# Altium PCB LiBattPack8.PcbDoc
Units mil, origin at the board's own origin, x right, y up, seen from the top; angles counter-clockwise.
Board outline 2950 x 6760 mil, 2 copper layers (Top Layer, Bottom Layer); 15 components, 6 nets, 54 pads, 0 vias.
Unrouted connection lines stored in the file: 36.
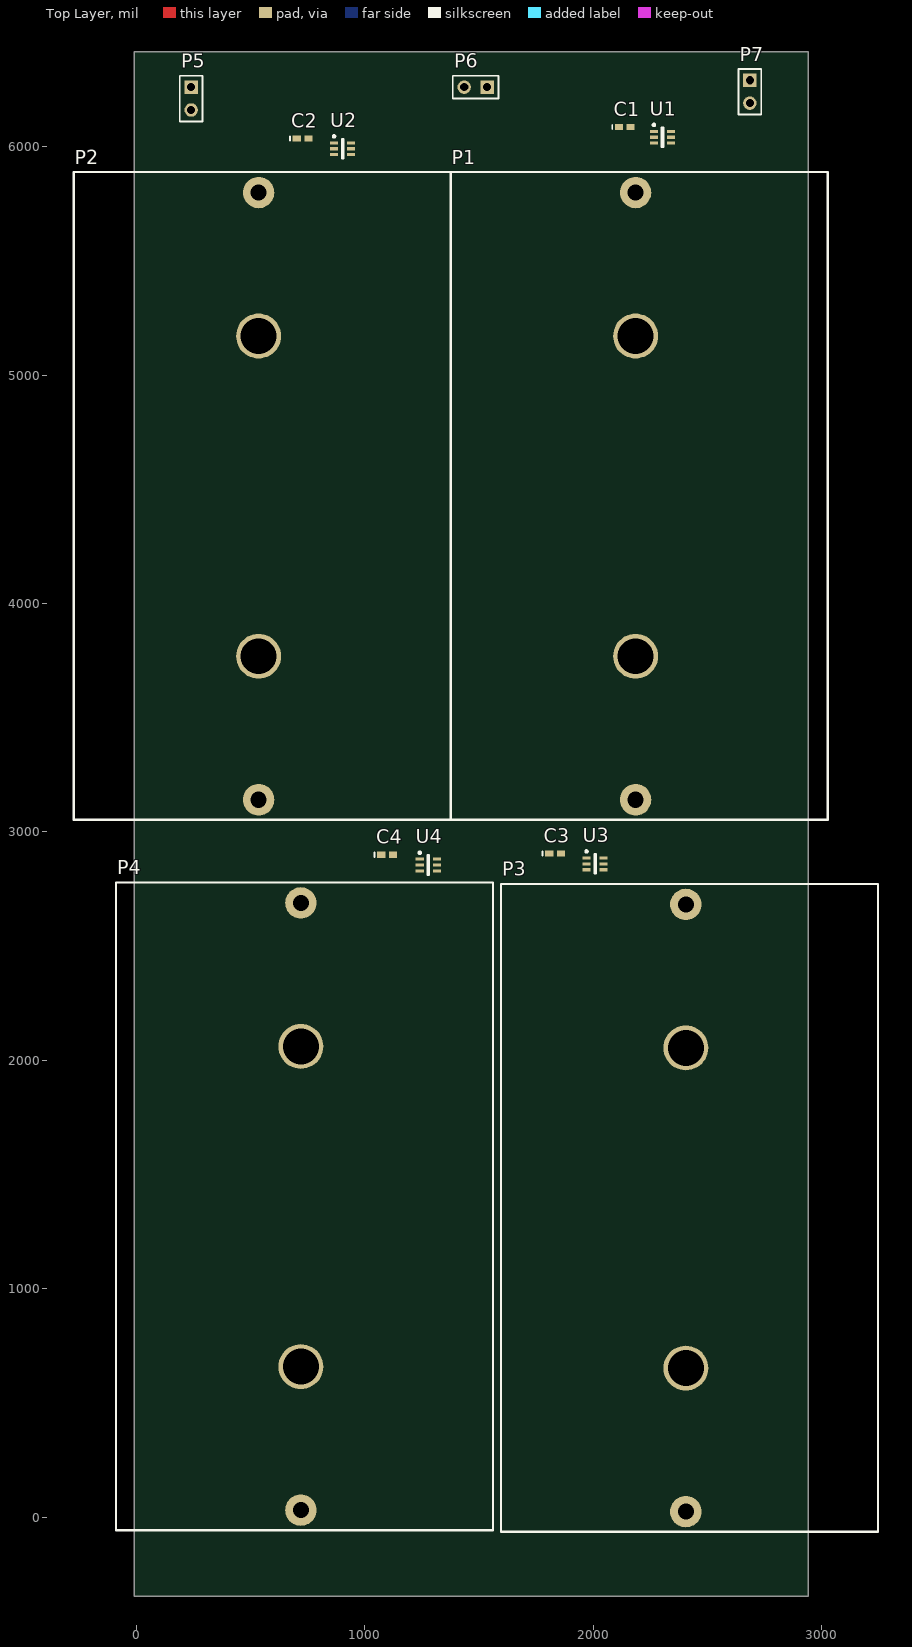
[diagram p0: Top Layer view]
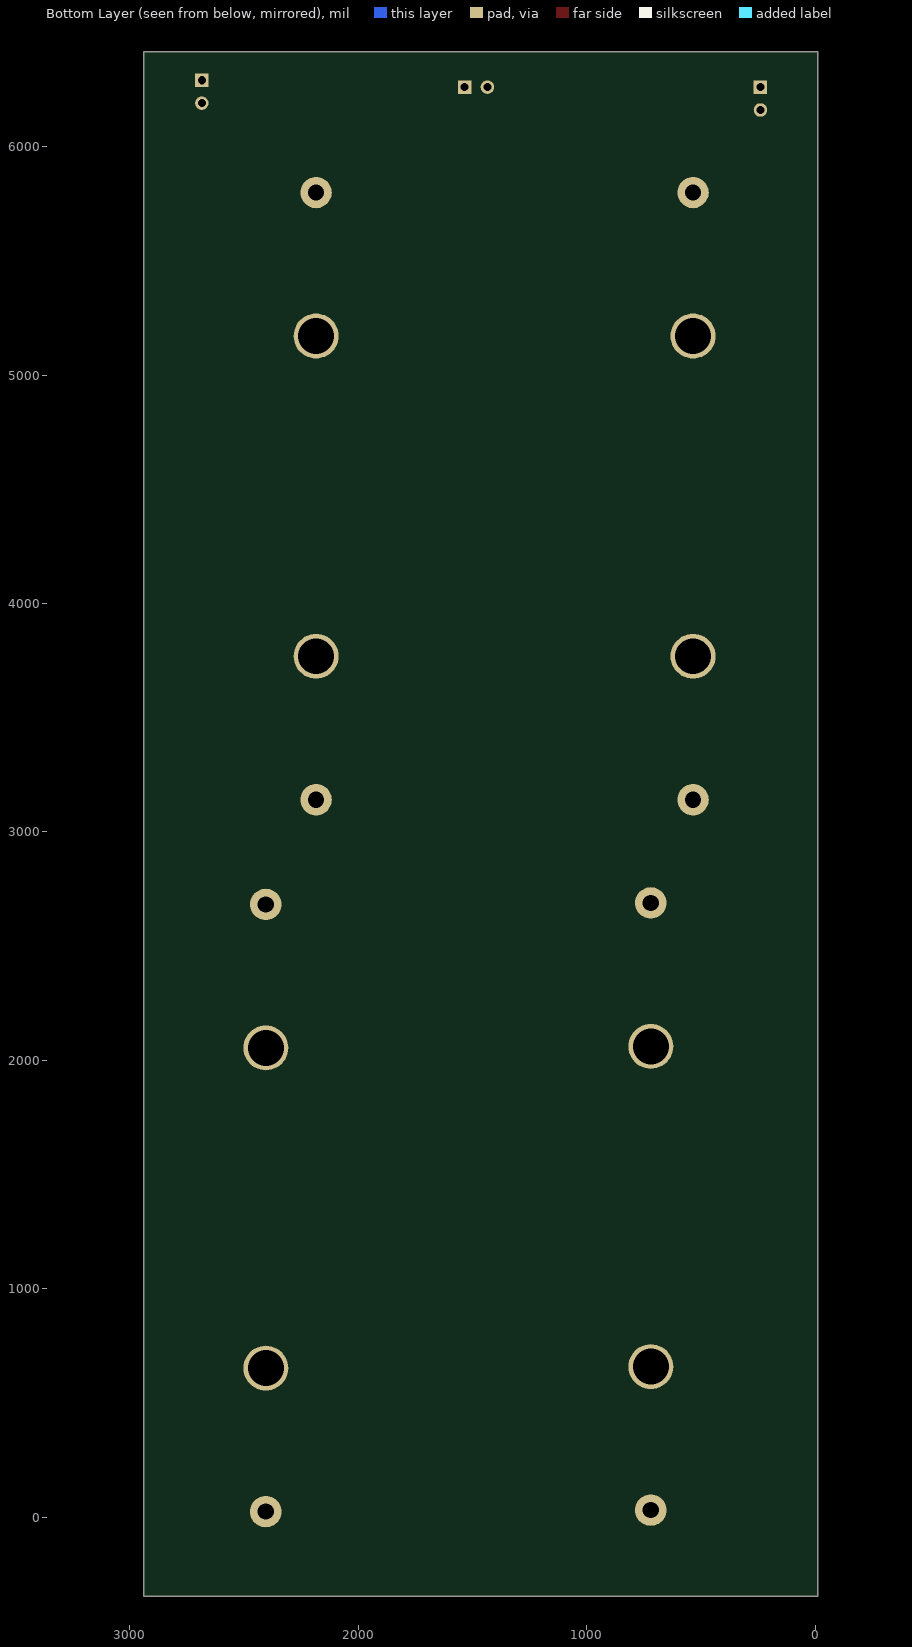
[diagram p1: Bottom Layer view, seen from below]

## Layer stack, top to bottom
Top Solder: solder mask 0.4, Solder Resist, Dk 3.5
Top Layer: signal copper 1.4
Dielectric 1: dielectric 12.6, FR-4, Dk 4.8
Bottom Layer: signal copper 1.4
Bottom Solder: solder mask 0.4, Solder Resist, Dk 3.5

## Board outline
-10,-345 2940,-345 2940,6415 -10,6415

## Design rules (kind name [scope] priority, off if disabled: settings)
Clearance [All] p1: gap=10 ignorepadtopadclearanceinfootprint=FALSE except(0: Arc-Hole Track-Hole SMDPad-Hole THPad-Hole Via-Hole Fill-Hole Poly-Hole Region-Hole Text-Hole)
PolygonConnect [All] p1: connectstyle=Relief reliefconductorwidth=10 reliefentries=4 polygonreliefangle="90 Angle" airgapwidth=10
RoutingVias [All] p1: holewidth=28 width=50 viastyle="Through Hole" minholewidth=28 minwidth=50 maxholewidth=28 maxwidth=50
SolderMaskExpansion [All] p1: expansion=4 istentingtop=FALSE
Width [All] p1: maxlimit=10 minlimit=10 preferedwidth=10
30 further rules are at their usual default settings.

## Components (designator, comment, footprint, x,y, rotation, side; value= is the part's Value field where it differs from the comment)
C1 "1uF" 0402 2137.6,6085.59 r0 top value=0.1uF
C2 "1uF" 0402 727.6,6035.59 r0 top value=0.1uF
C3 "1uF" 0402 1832.6,2905.59 r0 top value=0.1uF
C4 "1uF" 0402 1097.6,2900.59 r0 top value=0.1uF
P1 "D-cell" Battery-D 2185,4470 r270 top
P2 "D-cell" Battery-D 535,4470 r270 top
P3 "D-cell" Battery-D 2405,1354.21 r270 top
P4 "D-cell" Battery-D 720,1360.79 r270 top
P5 "Header 2" HDR1X2 240,6260 r270 top
P6 "Header 2" HDR1X2 1535,6260 r180 top
P7 "Header 2" HDR1X2 2685,6290 r270 top
U1 "LM66100" SC-70-6 2302.6,6040.59 r0 top
U2 "LM66100" SC-70-6 902.6,5990.59 r0 top
U3 "LM66100" SC-70-6 2007.6,2860.59 r0 top
U4 "LM66100" SC-70-6 1277.6,2855.59 r0 top

## Footprints (in the part's own frame and the unit in brackets; to place one, negate y for a bottom-side part, rotate by r counter-clockwise, add the part's x,y. Pads: shape width x height; smd on the part's side, far side on the other; paste and mask are expansions set on the pad)
0402 [mm] "Chip Capacitor; Body 1.0 x 0.5 mm (LxW typ)"
  rect 0.9x0.7 smd: 1(-0.65,0) 2(0.65,0)
  silkscreen extent -1.4,-0.25 -1.4,0.25
Battery-D [mm] "Bulgin BX0037"
  round 3.5 hole 1.8: 0(-33.75,0) 1(33.75,0)
  round 5 hole 4: 2(-17.8,0) 3(17.8,0)
  silkscreen extent -36.02,-20.55 35.98,21.35
HDR1X2 [mm] "Connector; Header; 2 Position"
  rect 1.5x1.5 hole 0.9: 1(0,0)
  round 1.5 hole 0.9: 2(2.54,0)
  silkscreen extent -1.27,-1.27 3.81,1.27
SC-70-6 [mm] "SOT23, 6-Leads, Body 2.00x2.10mm, Pitch 0.65mm, IPC Medium Density"
  rect 0.9x0.35 smd: 1(-0.95,0.65) 2(-0.95,0) 3(-0.95,-0.65) 4(0.95,-0.65) 5(0.95,0) 6(0.95,0.65)
  silkscreen extent -1.07,-1.1 0.1,1.5, body extent -0.7,-1.07 0.7,1.08, height 1.1

## Part data
C1 C2 C3 C4: library part C0402, "Ceramic Chip Capacitor - Standard", PackageDocument=Mar-2001, Code_IPC="1005 [0402]", Code_JEITA=0402, ComponentLink1Description="Manufacturer Link", ComponentLink1URL=http://www.kemet.com/, ComponentLink2Description=Datasheet, ComponentLink2URL=http://www.kemet.com/kemet/web/homepage/kechome.nsf/vapubfilesname/F3102TA.pdf/$file/F3102TA.pdf, DatasheetDocument=Mar-2001, LatestRevisionDate=19-Mar-2004, LatestRevisionNote="Silkscreen size reduced.", Note="Footprint corresponds to dimensions for bulk cassette packaging. This case size has tightened tolerances.", PackageReference=0402, Published=17-Jul-2002, Publisher="Altium Limited"
P1 P2 P3 P4: library part Battery-D, Supplier Part Number 1=06WX9339, Supplier 1=Newark
P5 P6 P7: "Header, 2-Pin", LatestRevisionDate=17-Jul-2002, LatestRevisionNote="Re-released for DXP Platform.", Publisher="Altium Limited"

## Nets (pads, with @x,y where several pads share a name; then routed paths per layer and width w, separated by ;. In a path a pad name is that pad's centre, name@x,y a point inside that pad or via, vN(x,y) a via of type N, cw(c..) or ccw(c..) an arc to the next point about the centre after c; other vN are vias at no path point)
GND: C1.1 C2.1 C3.1 C4.1 P1.1 P2.1 P3.1 P4.1 P5.1 P6.1 P7.1 U1.2 U1.3 U1.5 U2.2 U2.3 U2.5 U3.2 U3.3 U3.5 U4.2 U4.3 U4.5
NetC1_2: C1.2 P1.0 U1.1
NetC2_2: C2.2 P2.0 U2.1
NetC3_2: C3.2 P3.0 U3.1
NetC4_2: C4.2 P4.0 U4.1
POW: P5.2 P6.2 P7.2 U1.6 U2.6 U3.6 U4.6
pads on no net: P1.2 P1.3 P2.2 P2.3 P3.2 P3.3 P4.2 P4.3 U1.4 U2.4 U3.4 U4.4

## Silkscreen, mask and mechanical layers (free items; w line width, h text height)
Mechanical 1:
  the board outline again, w10